# Altium PCB Robot_POWER.PcbDoc (part 2 of 3)
Units mil, origin at the board's own origin, x right, y up, seen from the top; angles counter-clockwise.
Board outline 5791.97 x 4531.5 mil, 4 copper layers (Top Layer, GND02, GND03, Bottom Layer), stack 23.756 mil thick; 192 components, 81 nets, 533 pads, 1202 vias.
Unrouted connection lines stored in the file: 18.
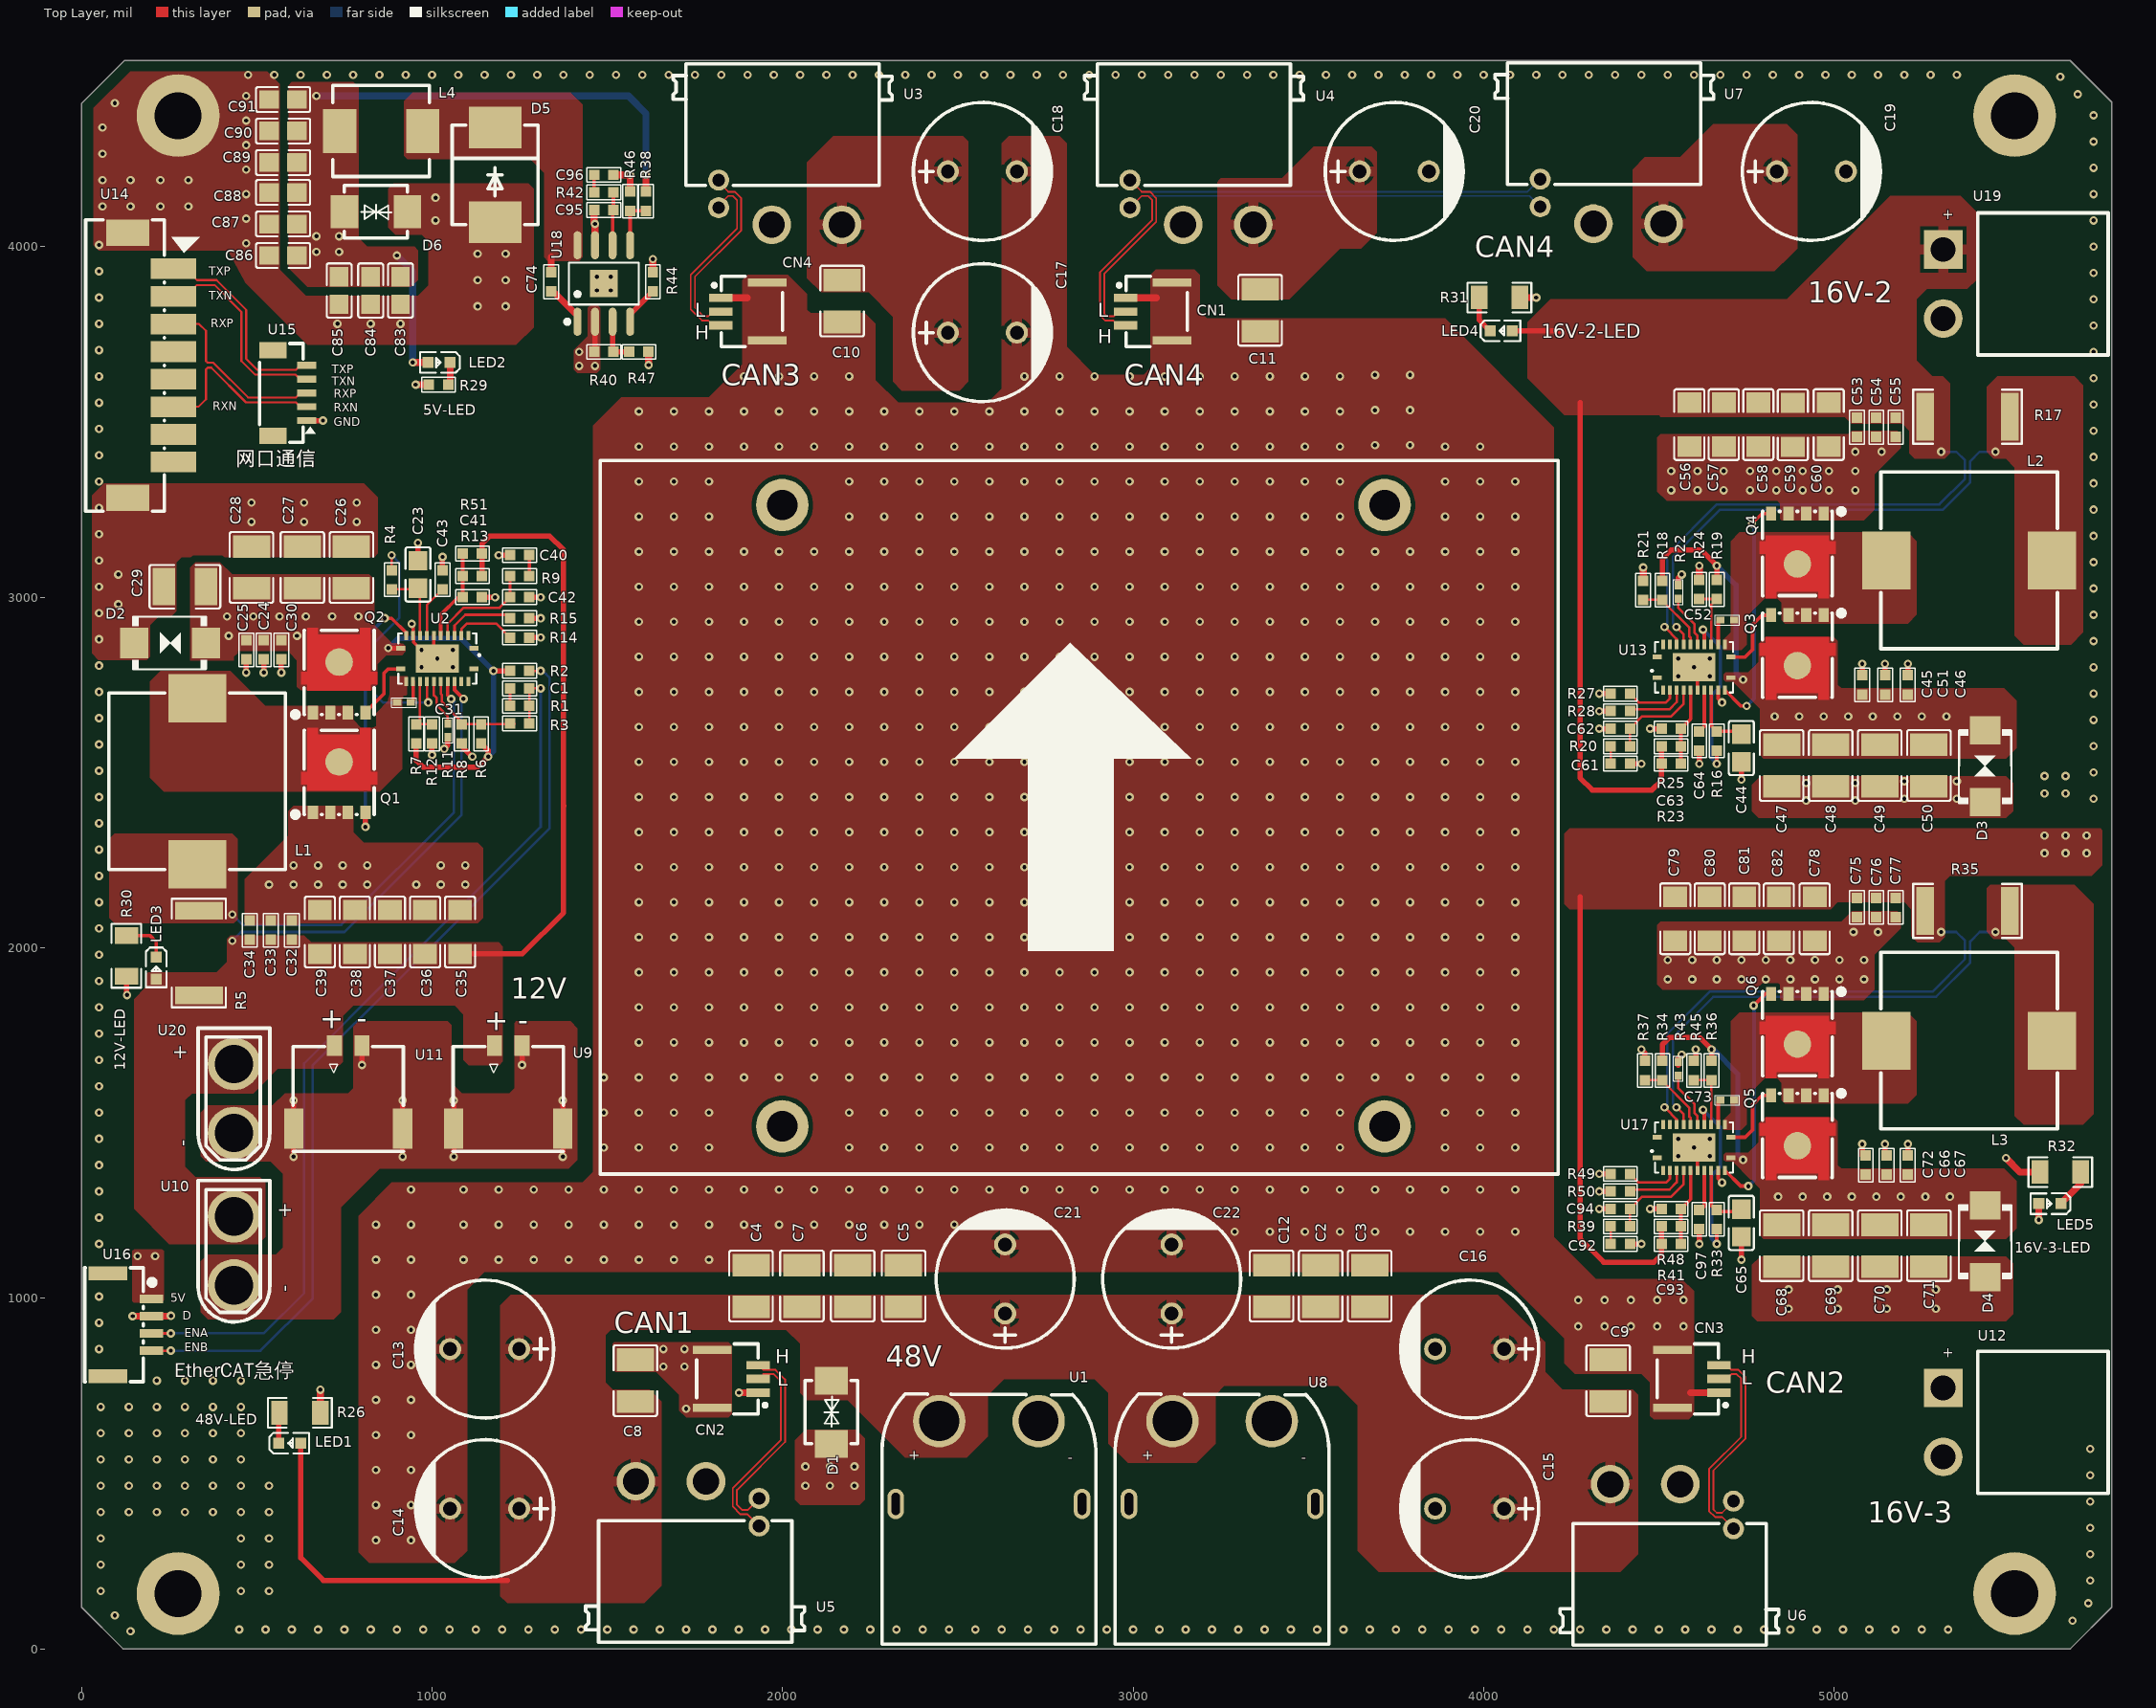
[diagram p0: Top Layer view]

## Via types
v1: diameter 24, hole 12, Top Layer to Bottom Layer, tented both sides, 1202 vias

## Nets (pads, with @x,y where several pads share a name; then routed paths per layer and width w, separated by ;. In a path a pad name is that pad's centre, name@x,y a point inside that pad or via, vN(x,y) a via of type N, cw(c..) or ccw(c..) an arc to the next point about the centre after c; other vN are vias at no path point) (continued)
EN1: (continued)
  Top Layer w7: U2.19@1024.8,2759.7 1025.41,2759.09 1025.41,2723.6 1028.04,2720.97 1028.04,2718.34 1028.24,2718.14 1028.24,2701.54 1085,2644.77 R8.1@1085,2637.5 R6.2@1140,2637.5 R3.1@1235,2637.5 ; R3.1@1220,2637.5 R3.1@1222.5,2640
EN2: R18.2 R21.1 U13.19 | length 210.4
  Top Layer w7: R21.1@4460.01,2992.5 R18.2@4510,2992.5 4510,2990 4586.8,2913.2 4586.8,2888.2 4590.2,2884.8 U13.19@4590.2,2865.3
EN3: R34.2 R37.1 U17.19 | length 210.4
  Top Layer w7: R37.1@4460,1622.5 R34.2@4510,1622.5 4510,1620 4586.8,1543.2 4586.8,1518.2 4590.2,1514.8 U17.19@4590.2,1495.3
ENA: C1.1 R1.2 R3.2 U16.3 | length 2620
  Top Layer w7: U16.3@199.81,899.77 v1(254.77,899.77) ; R3.2@1277.5,2640 R1.2@1277.5,2690 C1.1@1277.5,2740 v1(1310,2740)
  Bottom Layer w7: v1(254.77,899.77) 255,900 520,900 635,1015 635,1670 890,1925 1310,2345 v1(1310,2740)
ENB: R2.1 U16.4 | length 2638.2
  Top Layer w7: U16.4@199.81,850.55 v1(254.77,850.55) ; R2.1@1277.5,2790 v1(1310,2790)
  Bottom Layer w7: v1(254.77,850.55) 510.55,850.55 660,1000 660,1665 900,1905 1335,2340 1335,2771.21 1325,2781.21 1316.21,2790 v1(1310,2790)
FB-12V: C41.2 R13.1 R51.2 U2.6 | length 263.2
  Top Layer w10: U2.6@1024.8,2890.2 1024.8,2950 1074.8,3000 R13.1@1087.5,3000 C41.2@1087.5,3060 R51.2@1087.5,3120
FB-16-2V: C63.2 R23.2 R25.1 U13.6 | length 221.3
  Top Layer w10: R23.2@4562.5,2525 C63.2@4562.5,2575 R25.1@4562.5,2625 4590.2,2652.7 U13.6@4590.2,2734.8
FB-16-3V: C93.2 R41.2 R48.1 U17.6 | length 221.3
  Top Layer w10: C93.2@4562.5,1155 R41.2@4562.5,1205 R48.1@4562.5,1255 4590.2,1282.7 U17.6@4590.2,1364.8
FB_5V: R38.1 R46.2 U18.5 | length 143.4
  Top Layer w10: U18.5@1565,4004.1 R46.2@1565,4102.5 R38.1@1610,4102.5